# Altium PCB Pukk-Sensor-PCB.PcbDoc (part 4 of 6)
Units mil, origin at the board's own origin, x right, y up, seen from the top; angles counter-clockwise.
Board outline 3937.01 x 3149.61 mil, 4 copper layers (Top Layer, Layer 1, Layer 2, Bottom Layer), stack 61.653 mil thick; 261 components, 166 nets, 704 pads, 236 vias.
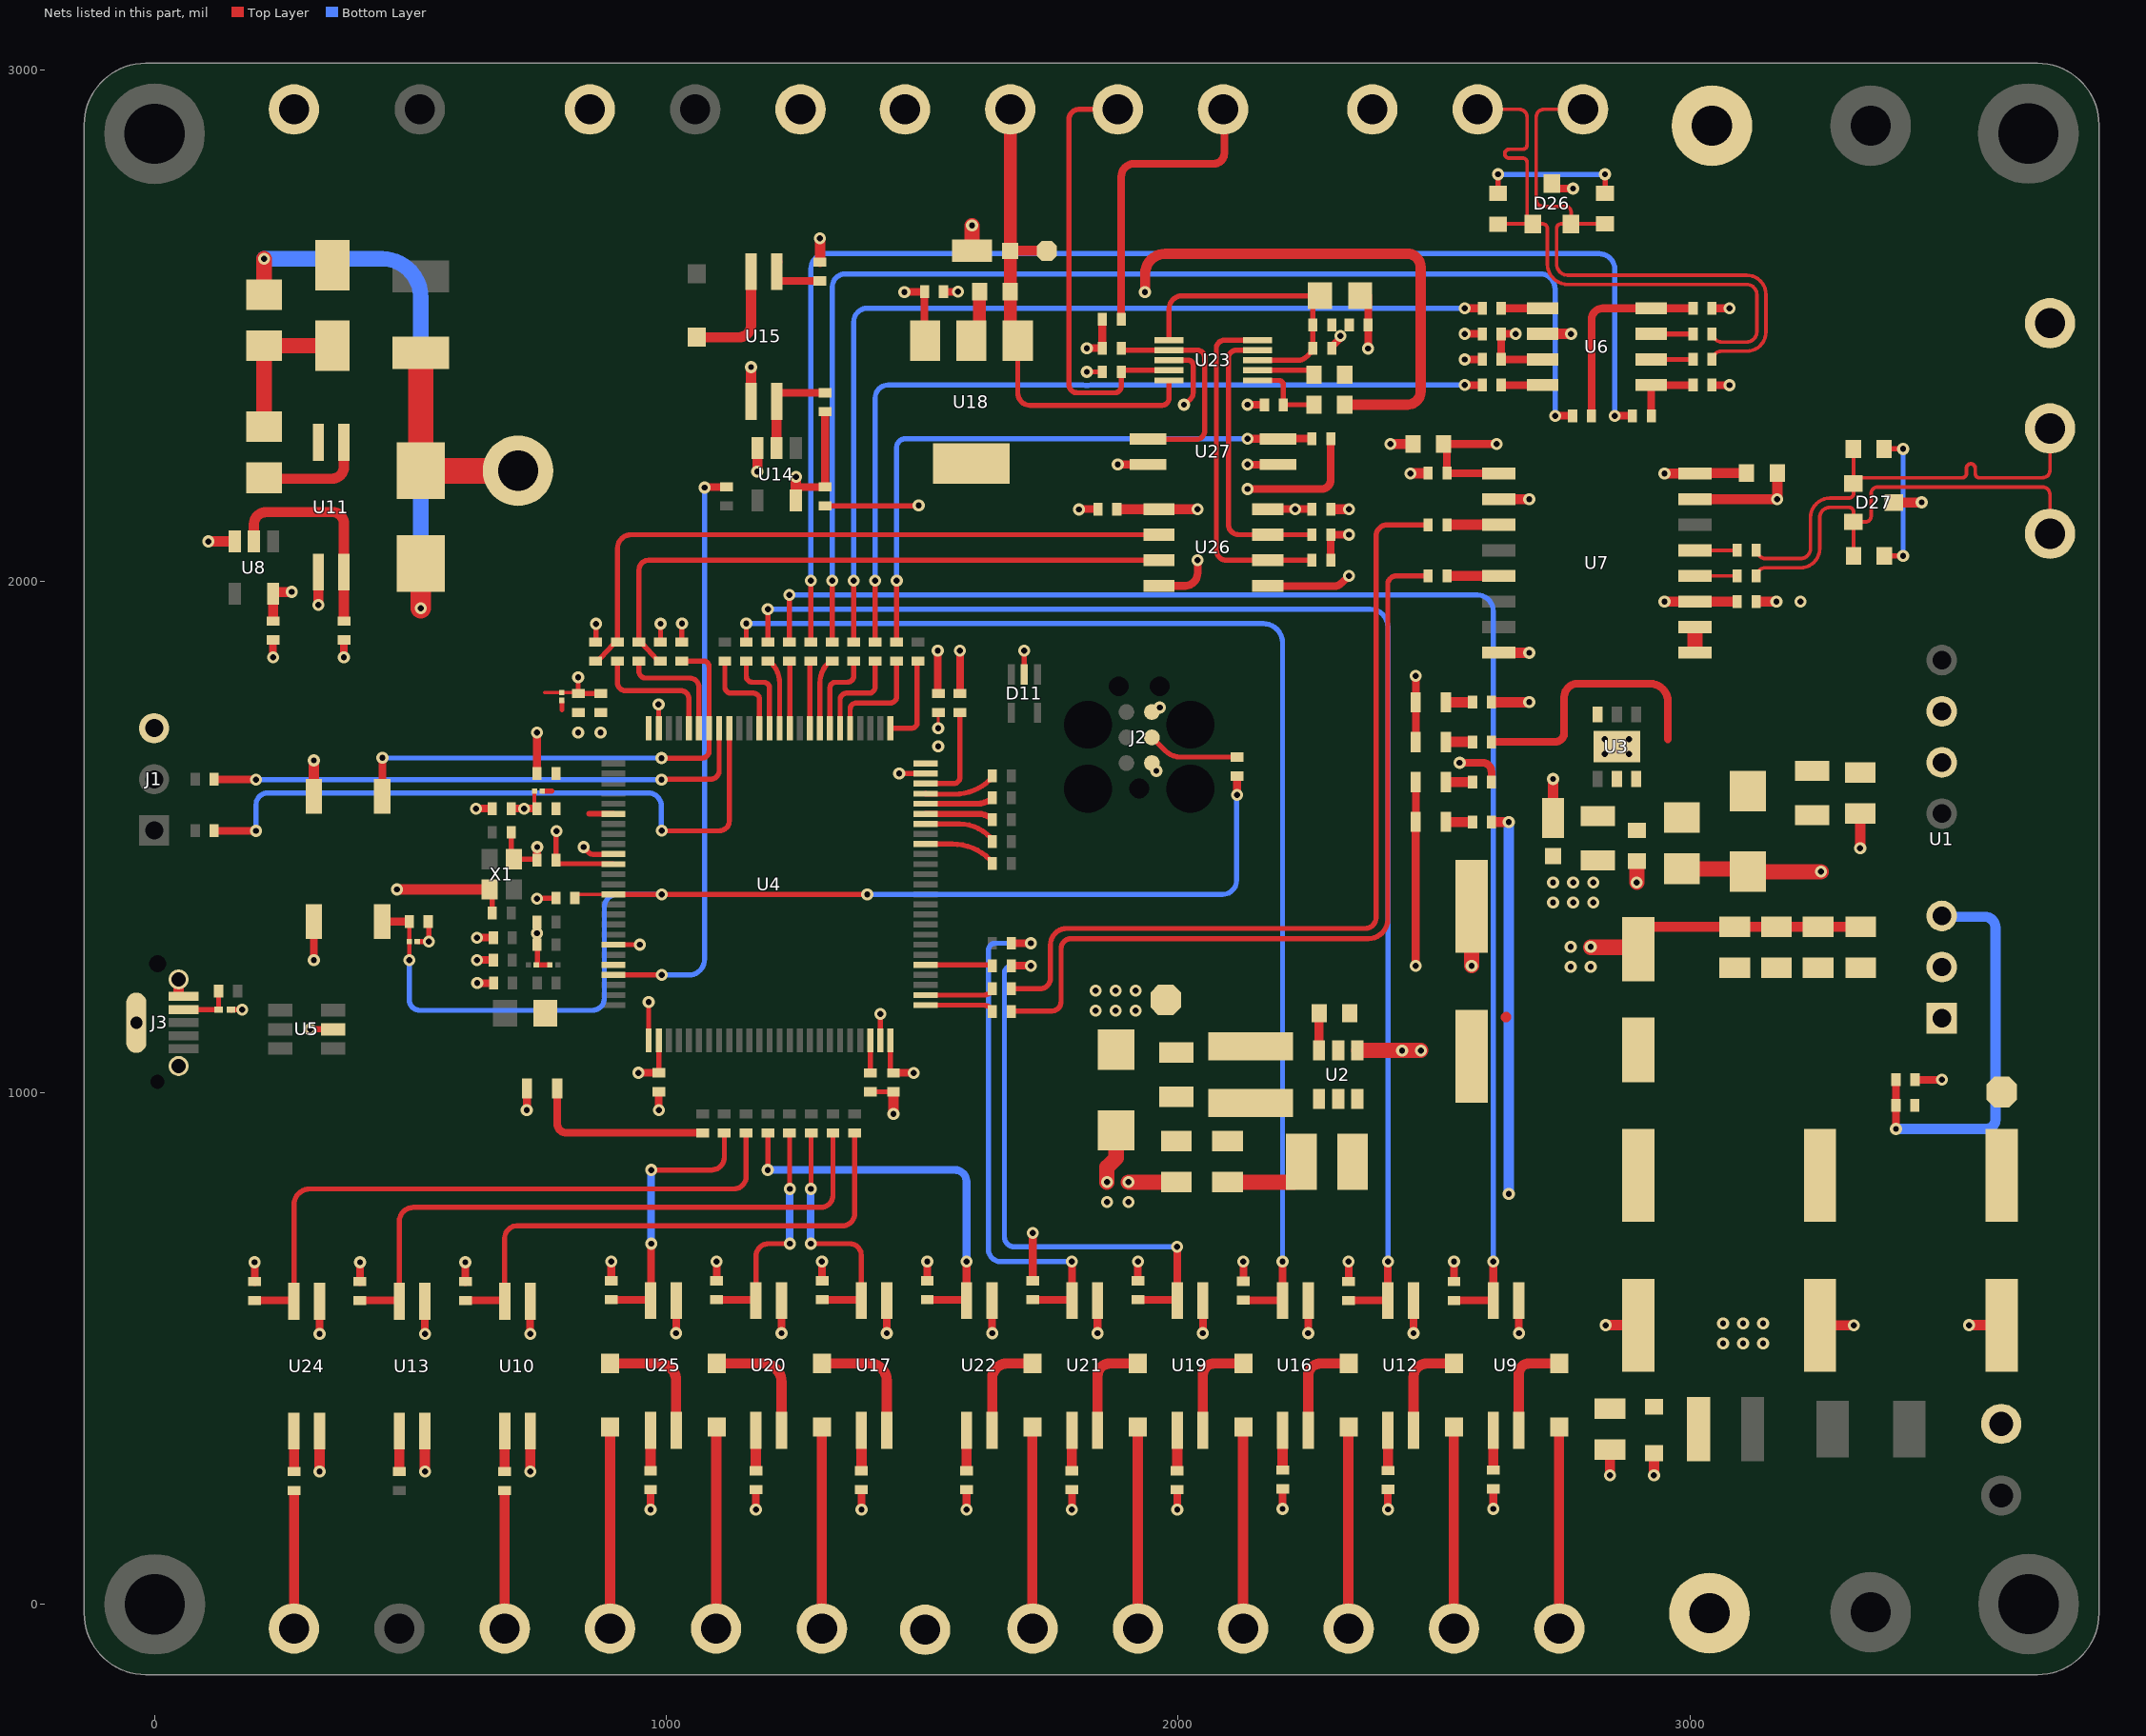
[diagram p4: the nets of this part, all layers, seen from the top]

## Part data (continued)
R66: library part RC1206FR-071KL, "RES 1K OHM 1% 1/4W 1206", Case Code (Imperial)=1206, Case Code (Metric)=3216, LCSC Part Number=C131398, Manufacturer=Yageo, Max Operating Temperature=155°C, Min Operating Temperature=-55°C, Power Rating=250mW, Resistance Tolerance=1%, Resistor Type="Thick Film", Temperature Coefficient=100ppm/°C, Voltage Rating=200V, Case/Package=1206, ComponentLink1Description=https://datasheet.ciiva.com/11808/0900766b80c6630a-11808217.pdf?src-supplier=Rs, ComponentLink1URL=https://datasheet.ciiva.com/11808/0900766b80c6630a-11808217.pdf?src-supplier=Rs, ComponentLink2Description=https://datasheet.ciiva.com/29181/402540-da-01-en-smd-widerstand-chip1206-1-kohm-29181462.pdf?src-supplier=Conrad, ComponentLink2URL=https://datasheet.ciiva.com/29181/402540-da-01-en-smd-widerstand-chip1206-1-kohm-29181462.pdf?src-supplier=Conrad, ComponentLink3Description=https://datasheet.ciiva.com/46445/444357-46445708.pdf?src-supplier=Element14, ComponentLink3URL=https://datasheet.ciiva.com/46445/444357-46445708.pdf?src-supplier=Element14, Depth=1.6mm, Height=0.55mm, Item Type=Resistors, Lead Free="Lead Free", Length=3.1mm, Manufacturer Part Number=RC1206FR-071KL, Packaging="Tape and Reel", Pricing="5000=0.003, 20000=0.0029, 75000=0.0028, 125000=0.0033, 150000=0.0027, 250000=0.0032, 375000=0.0026 (USD)", Reach SVHC Compliant=Unknown, RoHS=Yes, RoHS Compliant=Yes, Series=RC, Stock=1675000, Supplier="Future Electronics", Technology="THICK FILM", Termination=SMD/SMT, Tolerance=1%, Voltage Rating (AC)=200V
R67: library part RC1206FR-07330RL, "RES 330 OHM 1% 1/4W 1206", LCSC Part Number=C114944, Manufacturer=Yageo, Voltage Rating (AC)=200V, ComponentLink1Description=https://datasheet.ciiva.com/11819/0900766b80c6630a-11819921.pdf?src-supplier=Rs, ComponentLink1URL=https://datasheet.ciiva.com/11819/0900766b80c6630a-11819921.pdf?src-supplier=Rs, ComponentLink2Description=https://datasheet.ciiva.com/17422/pyu-rc1206-51-rohs-l-4-17422588.pdf?src-supplier=Future+Electronics, ComponentLink2URL=https://datasheet.ciiva.com/17422/pyu-rc1206-51-rohs-l-4-17422588.pdf?src-supplier=Future+Electronics, Item Type=Resistors, Lead Free=5697LeadFree, Manufacturer Part Number=RC1206FR-07330RL, Pricing="5000=0.0038, 20000=0.0037, 75000=0.0035, 125000=0.0035, 250000=0.0033 (USD)", RoHS=Yes, Stock=365000, Supplier="Future Electronics"
R79: library part RC0603FR-0775RL, "RES 75 OHM 1% 1/10W 0603", Case Code (Imperial)=0603, Case Code (Metric)=1608, LCSC Part Number=C112309, Manufacturer=Yageo, Max Operating Temperature=155°C, Max Power Dissipation=100mW, Min Operating Temperature=-55°C, Package Quantity=1, Resistance Tolerance=1%, Resistor Type="Thick Film", Supplier Part Number=311-75.0HRCT-ND, Temperature Coefficient=100ppm/°C, Voltage Rating=50V, Case/Package=0603, Category="Chip SMD Resistors", Construction=Rectangular, Depth=0.8mm, Features="Moisture Resistant", Height=0.022inch, Item Type=Resistor, Lead Free=5697LeadFree, Length=0.063inch, Manufacturer Part Number=RC0603FR-0775RL, Military Standard=Not, Number of Terminations=2, Packaging="Tape and Reel", Power Rating=100mW, Pricing="1=0.1, 10=0.019, 50=0.0112, 100=0.0093, 500=0.00622, 1000=0.00532 (USD)", Reach SVHC Compliant=No, RoHS=Yes, RoHS Compliant=Yes, Series=RC, Stock=844005, Supplier=Digikey, Technology="THICK FILM", Termination=SMD/SMT, Tolerance=1%, Voltage Rating (DC)=50V, Width=0.031inch
R87: library part RC0402FR-0749K9L, "RES 49.9K OHM 1% 1/16W 0402", Case Code (Imperial)=0402, Case Code (Metric)=1005, LCSC Part Number=C137969, Manufacturer=Yageo, Max Operating Temperature=155°C, Max Power Dissipation=63mW, Min Operating Temperature=-55°C, Power Rating=62.5mW, Supplier Part Number=311-49.9KLRCT-ND, Temperature Coefficient=100ppm/°C, Tolerance=1%, Voltage Rating=50V, Case/Package=0402, Category="Chip SMD Resistors", ComponentLink1Description=https://datasheet.ciiva.com/17071/pyu-rc0402-51-rohs-l-6-r-17071066.pdf?src-supplier=Future+Electronics, ComponentLink1URL=https://datasheet.ciiva.com/17071/pyu-rc0402-51-rohs-l-6-r-17071066.pdf?src-supplier=Future+Electronics, Construction=Rectangular, Depth=0.5mm, Features="Moisture Resistant", Item Type=Resistor, Lead Free="Lead Free", Length=1mm, Manufacturer Part Number=RC0402FR-0749K9L, Military Standard=Not, Number of Terminations=2, Packaging="Tape and Reel", Pricing="1=0.1, 10=0.015, 50=0.0088, 100=0.0073, 500=0.00488, 1000=0.00417, 5000=0.00297 (USD)", RoHS=Yes, RoHS Compliant=Yes, Series=RC, Stock=5084418, Supplier=Digikey, Termination=SMD/SMT, Voltage Rating (DC)=50V
R91 R93: library part RT0603BRD0710KL, "RES SMD 10K OHM 0.1% 1/10W 0603", Case/Package=0603, LCSC Part Number=C95204, Manufacturer=Yageo, Max Operating Temperature=155°C, Min Operating Temperature=-55°C, Package Height=0.45mm, Package Length=1.6mm, Package Style=SMTMeter, Package Width=0.8mm, Power=100mW, Rated Temperature=70°C, Resistor Type="FIXED RESISTOR", Supplier Part Number 1=1991391P, Temperature Coefficient=25ppm/°C, Tolerance=0.1%, Working Voltage=75V, Category="Chip SMD Resistors", ComponentLink1Description=https://datasheet.ciiva.com:443/pdfs/VipMasterIC/IC/YAGO/YAGO-S-A0008510989/YAGO-S-A0008510989-1.pdf?src-supplier=IHS+Markit, ComponentLink1URL=https://datasheet.ciiva.com:443/pdfs/VipMasterIC/IC/YAGO/YAGO-S-A0008510989/YAGO-S-A0008510989-1.pdf?src-supplier=IHS+Markit, ComponentLink2Description=https://datasheet.ciiva.com/5624/pyu-rt-1-to-0-05-rohs-l-4-5624351.pdf?src-supplier=Mouser, ComponentLink2URL=https://datasheet.ciiva.com/5624/pyu-rt-1-to-0-05-rohs-l-4-5624351.pdf?src-supplier=Mouser, ComponentLink3Description=https://datasheet.ciiva.com/29721/pyu-rt-1-to-0-05-rohs-l-4-29721177.pdf?src-supplier=Digi-Key, ComponentLink3URL=https://datasheet.ciiva.com/29721/pyu-rt-1-to-0-05-rohs-l-4-29721177.pdf?src-supplier=Digi-Key, Construction=Chip, Item Type=Resistor, Manufacturer Part Number=RT0603BRD0710KL, Mounting Technology="Surface Mount", Packaging="Tape and Reel", Pins=2, Pricing 1="100=0.29800, 250=0.27800, 500=0.25900, 1000=0.23700 (GBP)", Reach SVHC Compliant=Yes, RoHS=Yes, RoHS Compliant=Yes, Stock 1=20510, Supplier 1=Rs, Technology="THIN FILM", Termination=Wraparound
R102 R103: library part RC0603JR-070RL, "RES 0 OHM JUMPER 1/10W 0603", Case Code (Imperial)=0603, Case Code (Metric)=1608, LCSC Part Number=C95177, Manufacturer=Yageo, Max Operating Temperature=155°C, Max Power Dissipation=100mW, Min Operating Temperature=-55°C, Package Quantity=5000, Resistance=0mR, Resistance Tolerance=5%, Resistor Type="Thick Film", Supplier Part Number 1=311-0.0GRCT-ND, Temperature Coefficient=200ppm/°C, Tolerance=1%, Voltage Rating=50V, Case/Package=0603, Category="Chip SMD Resistors", Construction=Rectangular, Contact Plating=Tin,Matte, Depth=0.8mm, Features="Moisture Resistant", Height=0.45mm, Item Type=Resistor, Lead Free="Lead Free", Length=1.6mm, Manufacturer Part Number=RC0603JR-070RL, Military Standard=Not, Number of Pins=2, Number of Terminations=2, Packaging="Tape and Reel", Power Rating=100mW, Pricing 1="1=0.10000, 10=0.01700, 25=0.01240, 50=0.00960, 100=0.00700, 250=0.00536, 500=0.00430, 1000=0.00316 (USD)", Radiation Hardening=No, Reach SVHC Compliant="No SVHC", RoHS=Yes, RoHS Compliant=Yes, Series=RC, Size Code=0603, Stock 1=18081776, Supplier 1=Digi-Key, Technology="THICK FILM", Termination=SMD/SMT, Voltage Rating (DC)=50V, Width=0.8mm
SW1 SW2: "SWITCH TACTILE SPST-NO 0.05A 12V", Contact Current Rating=50mA, Contact Resistance=100mR, Insulation Resistance=100MR, LCSC Part Number=C231329, Manufacturer=Omron, Max Operating Temperature=70°C, Max Voltage Rating (DC)=12V, Min Operating Temperature=-25°C, Operating Force=1.5N, Package Quantity=1, Ratings="Dust Proof,IP40", Supplier Part Number 1=SW1020DKR-ND, Actuator Length=0.4mm, Actuator Type=Standard, ComponentLink1Description=http://www.farnell.com/datasheets/60838.pdf?src-supplier=Farnell, ComponentLink1URL=http://www.farnell.com/datasheets/60838.pdf?src-supplier=Farnell, ComponentLink2Description=http://www.farnell.com/datasheets/60838.pdf?src-supplier=Element14, ComponentLink2URL=http://www.farnell.com/datasheets/60838.pdf?src-supplier=Element14, ComponentLink3Description=https://omronfs.omron.com/en_US/ecb/products/pdf/en-b3u.pdf?src-supplier=Digi-Key, ComponentLink3URL=https://omronfs.omron.com/en_US/ecb/products/pdf/en-b3u.pdf?src-supplier=Digi-Key, ComponentLink4Description=http://www.omron.com/ecb/products/pdf/en-b3u.pdf?src-supplier=Digi-Key, ComponentLink4URL=http://www.omron.com/ecb/products/pdf/en-b3u.pdf?src-supplier=Digi-Key, ComponentLink5Description=https://www.distrelec.biz/Web/Downloads/he/et/B3U_eng_datasheet.pdf?mime=application%2Fpdf&src-supplier=Distrelec, ComponentLink5URL=https://www.distrelec.biz/Web/Downloads/he/et/B3U_eng_datasheet.pdf?mime=application%2Fpdf&src-supplier=Distrelec, ComponentLink6Description=http://www.onlinecomponents.com/productFiles/mf-OM/en-b3u.pdf?src-supplier=Onlinecomponents.com, ComponentLink6URL=http://www.onlinecomponents.com/productFiles/mf-OM/en-b3u.pdf?src-supplier=Onlinecomponents.com, ComponentLink7Description=https://www.verical.com/server-webapp/html/getDatasheet?partID=552554&src-supplier=Verical, ComponentLink7URL=https://www.verical.com/server-webapp/html/getDatasheet?partID=552554&src-supplier=Verical, ComponentLink8Description=http://www.farnell.com/datasheets/1685550.pdf?src-supplier=Element14, ComponentLink8URL=http://www.farnell.com/datasheets/1685550.pdf?src-supplier=Element14, ComponentLink9Description=http://www.farnell.com/datasheets/2610940.pdf?src-supplier=Farnell, ComponentLink9URL=http://www.farnell.com/datasheets/2610940.pdf?src-supplier=Farnell, ComponentLink10Description=https://www.alliedelec.com/m/d/4c8a9ef82804fc3c241a13c1e298fd73.pdf?src-supplier=Allied+Electronics, ComponentLink10URL=https://www.alliedelec.com/m/d/4c8a9ef82804fc3c241a13c1e298fd73.pdf?src-supplier=Allied+Electronics, Contact Material=Silver, Current Rating=50mA, Depth=2.5mm, Electrical Life=200000Cycles, Height=1.2mm, Illumination Type=Non-Illuminated,Illuminated, Item Type=Switch, Lead Free="Lead Free", Length=4mm, Manufacturer Part Number=B3U-1000P, Max Current Rating=50mA, Mechanical Life=200000Cycles, Mount="Surface Mount", Orientation=Straight, Packaging="Tape and Reel", Pricing 1="1=1, 10=0.961, 25=0.9064, 50=0.7976, 100=0.7251, 250=0.68888, 500=0.67074, 1000=0.52571 (USD)", REACH SVHC=Unknown, Stock 1=116454, Supplier 1=Digi-Key, Switch Function=Off-Mom, Switch Travel=0.15mm, Termination=SMD/SMT, Throw Configuration=SPST, Voltage Rating (DC)=12V, Weight=0.000776oz, Width=3mm
U1: "SIP Isolated Power Modules ROHS", LCSC Part Number=C5369846, Manufacturer=YLPTEC, Package=SIP, ComponentLink1Description=LCSC, ComponentLink1URL=https://www.lcsc.com/product-detail/Isolated-Power-Modules_YLPTEC-VRB1205S-6WR3_C5369846.html, Item Type="Power Module", Manufacturer Part Number=VRB1205S-6WR3
U2: "IC REG BUCK 5V 2A TSOT26", LCSC Part Number=C2071056, Manufacturer=Diodes, Supplier Part Number 1=AP63205WU-7DICT-ND, Category="Voltage Regulators - Switching", Item Type=IC, Manufacturer Part Number=AP63205WU-7, Pricing 1="1=0.88, 10=0.776, 25=0.7292, 100=0.5952, 250=0.55284, 500=0.4705, 1000=0.3764 (USD)", RoHS=Yes, Stock 1=88525, Supplier 1=Digi-Key
U3: "IC REG LINEAR 3.3V 1.3A 6DFN", LCSC Part Number=C283488, Manufacturer=STMicroelectronics, ComponentLink1Description=https://datasheet.ciiva.com/2053/cd00186925-2053848.pdf?src-supplier=Digikey, ComponentLink1URL=https://datasheet.ciiva.com/2053/cd00186925-2053848.pdf?src-supplier=Digikey, ComponentLink2Description=https://datasheet.ciiva.com/2053/cd00186925-2053849.pdf?src-supplier=Digikey, ComponentLink2URL=https://datasheet.ciiva.com/2053/cd00186925-2053849.pdf?src-supplier=Digikey, ComponentLink3Description=https://datasheet.ciiva.com/2053/cd00186925-2053850.pdf?src-supplier=Digikey, ComponentLink3URL=https://datasheet.ciiva.com/2053/cd00186925-2053850.pdf?src-supplier=Digikey, ComponentLink4Description=https://datasheet.ciiva.com/16489/cd00186925-16489850.pdf?src-supplier=Future+Electronics, ComponentLink4URL=https://datasheet.ciiva.com/16489/cd00186925-16489850.pdf?src-supplier=Future+Electronics, Item Type=IC, Manufacturer Part Number=ST1L05APU33R, Pricing="1=1.06, 10=0.766, 25=0.692, 100=0.6103, 250=0.57136, 500=0.5479, 1000=0.5286 (USD)", RoHS=Yes, Stock=7599, Supplier=Digikey
U4: "IC MCU 32BIT 1MB FLASH 100LQFP", Frequency=550MHz, LCSC Part Number=C730142, Manufacturer=STMicroelectronics, Max Operating Temperature=85°C, Max Supply Voltage=3.6V, Min Operating Temperature=-40°C, Nominal Supply Current=4uA, Density=1MB, Item Type=Microcontrollers, Manufacturer Part Number=STM32H723VGT6, Number of A/D Converters=1, Number of Channels=14, Number of I2C Channels=5, Number of I/Os=80, Number of SPI Channels=5, Number of Timers/Counters=4, Number of UART Channels=6, Pricing="1=9.579, 10=8.258, 25=7.389, 100=7.316, 250=6.922, 540=6.641, 1080=6.564 (USD)", RAM Size=564KB, RoHS=No, Stock=102408, Supplier="Arrow Electronics"
U5: "6A 12V 150W 6V Unidirectional 5V SOT-23-6 ESD and Surge Protection (TVS/ESD) ROHS", LCSC Part Number=C2827654, Manufacturer="TECH PUBLIC", Package=SOT-23-6, ComponentLink1Description=LCSC, ComponentLink1URL=https://www.lcsc.com/product-detail/ESD-and-Surge-Protection-TVS-ESD_TECH-PUBLIC-USBLC6-2SC6_C2827654.html, Item Type=(TVS/ESD), Manufacturer Part Number=USBLC6-2SC6
U6: "IC TRANSCEIVER HALF 1/1 8SOIC", Case/Package=SOIC, LCSC Part Number=C22396693, Manufacturer="Texas Instruments", Height=1.75mm, Item Type=IC, Length=4.9mm, Manufacturer Part Number=TCAN3414DR, Pins=8, Pricing="1=1.55, 10=1.1, 50=1.1, 100=0.895, 1000=0.763, 10000=0.681 (USD)", RoHS=No, Stock=201, Supplier=Mouser, Thickness=1.58mm, Width=3.91mm
U7: "IC TRANSCEIVER FULL 1/1 16SOIC", LCSC Part Number=C1848126, Manufacturer="Texas Instruments", ComponentLink1Description=http://www.ti.com/lit/gpn/iso1042?src-supplier=Digikey, ComponentLink1URL=http://www.ti.com/lit/gpn/iso1042?src-supplier=Digikey, Item Type=IC, Manufacturer Part Number=ISO1042DWR, Pricing="1=3.75, 10=2.83, 50=2.6, 100=2.35, 1000=2.09, 10000=1.92 (USD)", RoHS=Yes, Stock=2008, Supplier=Mouser
U8 U14: "IC INVERTER 1CH 1-INP SOT23-5", Case/Package=SOT-23, High Level Output Current=-8mA, LCSC Part Number=C7469, Low Level Output Current=8mA, Manufacturer="Texas Instruments", Max Operating Temperature=125°C, Max Supply Voltage=5.5V, Min Operating Temperature=-40°C, Min Supply Voltage=2V, Quiescent Current=1uA, ComponentLink1Description=https://datasheet.ciiva.com/4219/814sn74ahc1g14-4219764.pdf?src-supplier=Arrow+Electronics, ComponentLink1URL=https://datasheet.ciiva.com/4219/814sn74ahc1g14-4219764.pdf?src-supplier=Arrow+Electronics, ComponentLink2Description=https://datasheet.ciiva.com/15089/getdatasheetpartid-190002-15089353.pdf?src-supplier=Verical, ComponentLink2URL=https://datasheet.ciiva.com/15089/getdatasheetpartid-190002-15089353.pdf?src-supplier=Verical, ComponentLink3Description=https://datasheet.ciiva.com/7783/sn74ahc1g14-7783206.pdf?src-supplier=Element14, ComponentLink3URL=https://datasheet.ciiva.com/7783/sn74ahc1g14-7783206.pdf?src-supplier=Element14, ComponentLink4Description=https://datasheet.ciiva.com/7783/sn74ahc1g14-7783205.pdf?src-supplier=Element14, ComponentLink4URL=https://datasheet.ciiva.com/7783/sn74ahc1g14-7783205.pdf?src-supplier=Element14, ComponentLink5Description=https://datasheet.ciiva.com/46384/1882896-46384391.pdf?src-supplier=Element14, ComponentLink5URL=https://datasheet.ciiva.com/46384/1882896-46384391.pdf?src-supplier=Element14, ComponentLink6Description=https://datasheet.ciiva.com/1864/sn74ahc1g14-1864204.pdf?src-supplier=Digikey, ComponentLink6URL=https://datasheet.ciiva.com/1864/sn74ahc1g14-1864204.pdf?src-supplier=Digikey, ComponentLink7Description=https://datasheet.ciiva.com/1864/sn74ahc1g14-1864203.pdf?src-supplier=Digikey, ComponentLink7URL=https://datasheet.ciiva.com/1864/sn74ahc1g14-1864203.pdf?src-supplier=Digikey, ComponentLink8Description=https://datasheet.ciiva.com/1864/sn74ahc1g14-1864205.pdf?src-supplier=Digikey, ComponentLink8URL=https://datasheet.ciiva.com/1864/sn74ahc1g14-1864205.pdf?src-supplier=Digikey, ComponentLink9Description=https://datasheet.ciiva.com/48703/001074495-da-01-en-ic-schmitt-sn74ahc1g14dbvr-sot-23-5-tid-48703787.pdf?src-supplier=Conrad, ComponentLink9URL=https://datasheet.ciiva.com/48703/001074495-da-01-en-ic-schmitt-sn74ahc1g14dbvr-sot-23-5-tid-48703787.pdf?src-supplier=Conrad, Input Type="SCHMITT TRIGGER", Item Type=IC, Lead Free="Lead Free", Logic Function="Inverter,Schmitt Trigger", Manufacturer Part Number=SN74AHC1G14DBVR, Max Output current=8mA, Mounting Technology="Surface Mount", Number of Bits=1, Number of Circuits=1, Number of Elements=1, Number of Gates=1, Number of Inputs=1, Output Current=8mA, Packaging="Tape and Reel", Pins=5, Pricing="1=0.1, 10=0.062, 50=0.054, 100=0.046, 1000=0.037, 10000=0.031 (USD)", Propagation Delay=10.6ns, Radiation Hardening=No, Reach SVHC Compliant=No, RoHS=Yes, RoHS Compliant=Yes, Series=74AHC, Stock=69702, Supplier=Mouser, Technology=CMOS, Termination=SMD/SMT, Turn-On Delay Time=18.5ns, Weight=0.000557oz
U9 U10 U11 U12 U13 U15 U16 U17 U19 U20 U21 U22 U24 U25 U27: "OPTOISO 3.75KV 1CH TRANS 4-SSOP", LCSC Part Number=C4749236, Manufacturer="Vishay Semiconductors", ComponentLink1Description=https://datasheet.ciiva.com/14809/vos617a-14809107.pdf?src-supplier=Arrow+Electronics, ComponentLink1URL=https://datasheet.ciiva.com/14809/vos617a-14809107.pdf?src-supplier=Arrow+Electronics, ComponentLink2Description=https://datasheet.ciiva.com/30032/vos617a-30032543.pdf?src-supplier=Avnet, ComponentLink2URL=https://datasheet.ciiva.com/30032/vos617a-30032543.pdf?src-supplier=Avnet, ComponentLink3Description=https://datasheet.ciiva.com/18615/vos617a-18615995.pdf?src-supplier=Digikey, ComponentLink3URL=https://datasheet.ciiva.com/18615/vos617a-18615995.pdf?src-supplier=Digikey, Item Type=Optocouplers, Manufacturer Part Number=VOS617A-4T, Pricing="3000=0.1642, 6000=0.1638, 9000=0.1528, 15000=0.1513, 21000=0.1495, 30000=0.1428 (USD)", RoHS=Yes, Stock=6000, Supplier="Arrow Electronics"
U18: "IC REG LIN POS ADJ 500MA SOT223", Case/Package=SOT-223-4, LCSC Part Number=C840113, Manufacturer="Texas Instruments", Max Operating Temperature=125°C, Max Output current=500mA, Max Output Voltage=37V, Max Supply Voltage=40V, Min Input Voltage=4.2V, Min Operating Temperature=-40°C, Min Output Voltage=1.25V, Package Quantity=1, Power Supply Rejection Ratio (PSRR)=80dB, Quiescent Current=3.5mA, Reference Voltage=1.3V, Supplier Part Number=595-LM317MDCYR, Category="Voltage Regulators - Linear", ComponentLink1Description=https://datasheet.ciiva.com/1643/755612-1643356.pdf?src-supplier=Newark, ComponentLink1URL=https://datasheet.ciiva.com/1643/755612-1643356.pdf?src-supplier=Newark, ComponentLink2Description=https://datasheet.ciiva.com/41458/001014040-da-01-en-ic-reg-adj-0-5-lm317mdcyr-sot-223-4-tid-41458215.pdf?src-supplier=Conrad, ComponentLink2URL=https://datasheet.ciiva.com/41458/001014040-da-01-en-ic-reg-adj-0-5-lm317mdcyr-sot-223-4-tid-41458215.pdf?src-supplier=Conrad, ComponentLink3Description=https://datasheet.ciiva.com/1512/1814942-1512040.pdf?src-supplier=Element14, ComponentLink3URL=https://datasheet.ciiva.com/1512/1814942-1512040.pdf?src-supplier=Element14, ComponentLink4Description=https://datasheet.ciiva.com/46398/755612-46398903.pdf?src-supplier=Element14, ComponentLink4URL=https://datasheet.ciiva.com/46398/755612-46398903.pdf?src-supplier=Element14, ComponentLink5Description=https://datasheet.ciiva.com/46419/1814942-46419370.pdf?src-supplier=Element14, ComponentLink5URL=https://datasheet.ciiva.com/46419/1814942-46419370.pdf?src-supplier=Element14, ComponentLink6Description=https://datasheet.ciiva.com/2042/lm317m-2042100.pdf?src-supplier=Digikey, ComponentLink6URL=https://datasheet.ciiva.com/2042/lm317m-2042100.pdf?src-supplier=Digikey, ComponentLink7Description=https://datasheet.ciiva.com/2042/lm317m-2042099.pdf?src-supplier=Digikey, ComponentLink7URL=https://datasheet.ciiva.com/2042/lm317m-2042099.pdf?src-supplier=Digikey, ComponentLink8Description=https://datasheet.ciiva.com/2042/lm317m-2042101.pdf?src-supplier=Digikey, ComponentLink8URL=https://datasheet.ciiva.com/2042/lm317m-2042101.pdf?src-supplier=Digikey, ComponentLink9Description=https://datasheet.ciiva.com/14280/lm317mq-14280776.pdf?src-supplier=Avnet, ComponentLink9URL=https://datasheet.ciiva.com/14280/lm317mq-14280776.pdf?src-supplier=Avnet, Item Type=IC, Lead Free="Lead Free", Manufacturer Part Number=LM317MDCYR, Mounting Technology="Surface Mount", Number of Outputs=1, Number of Regulators=1, Output Current=500mA, Output Type=Adjustable, Output Voltage=37V, Packaging="Tape and Reel", Pins=4, Polarity=Positive, Pricing="1=0.67, 10=0.564, 50=0.564, 100=0.428, 500=0.359, 1000=0.283, 2500=0.263, 5000=0.245, 10000=0.236, 25000=0.227 (USD)", Radiation Hardening=No, Reach SVHC Compliant=No, RoHS=Yes, RoHS Compliant=Yes, Series=-, Stock=12890, Supplier=Mouser, Weight=0.006632oz
U23: "IC ADC 16BIT SIGMA-DELTA 10VSSOP", Case/Package=VSSOP, LCSC Part Number=C37593, Manufacturer="Texas Instruments", Max Operating Temperature=125°C, Max Supply Voltage=5.5V, Min Operating Temperature=-40°C, Min Supply Voltage=2V, Nominal Supply Current=150uA, Package Quantity=2500, Power Dissipation=900uW, Supplier Part Number=595-ADS1115IDGSR, Category="Analog to Digital Converters (ADCs)", ComponentLink1Description=https://datasheet.ciiva.com/4031/47725463s8438921n7713-4031028.pdf?src-supplier=Arrow+Electronics, ComponentLink1URL=https://datasheet.ciiva.com/4031/47725463s8438921n7713-4031028.pdf?src-supplier=Arrow+Electronics, Contact Plating=Gold, Conversion Rate=0.86KS/s, Height=1.07mm, Integral Nonlinearity (INL)=1LSB, Interface=I2C, Item Type=IC, Lead Free="Lead Free", Length=3mm, Manufacturer Part Number=ADS1115IDGSR, Max Supply Voltage (DC)=5.5V, Min Supply Voltage (DC)=2V, Number of A/D Converters=1, Number of Bits=16, Number of Channels=2, Number of Converters=1, Number of Inputs=4, Packaging="Tape and Reel", Pins=10, Polarity=Bipolar, Pricing="1=5.44, 10=4.76, 50=4.76, 100=4.01, 1000=2.88, 10000=2.78 (USD)", Reach SVHC Compliant=No, Resolution=16b, RoHS=Yes, RoHS Compliant=Yes, Sampling Rate=860S/s, Series=-, Stock=5925, Supplier=Mouser, Supply Type=Single, Thickness=1.02mm, Width=3mm
U26: "DGTL ISOLTR 2.5KV 2CH I2C 8-SOIC", Case/Package=SOIC, Isolated Power=No, LCSC Part Number=C179739, Manufacturer="Texas Instruments", Max Operating Temperature=125°C, Max Supply Voltage=5.5V, Min Operating Temperature=-40°C, Min Supply Voltage=3V, Package Quantity=1, Supply Current=3.6mA, Working Voltage=566V, Channel Type=Bidirectional, ComponentLink1Description=https://datasheet.ciiva.com/6579/iso1540-6579724.pdf?src-supplier=Digikey, ComponentLink1URL=https://datasheet.ciiva.com/6579/iso1540-6579724.pdf?src-supplier=Digikey, ComponentLink2Description=https://datasheet.ciiva.com/6579/iso1540-6579723.pdf?src-supplier=Digikey, ComponentLink2URL=https://datasheet.ciiva.com/6579/iso1540-6579723.pdf?src-supplier=Digikey, ComponentLink3Description=https://datasheet.ciiva.com/6579/iso1540-6579725.pdf?src-supplier=Digikey, ComponentLink3URL=https://datasheet.ciiva.com/6579/iso1540-6579725.pdf?src-supplier=Digikey, ComponentLink4Description=https://datasheet.ciiva.com/14196/iso1540-14196749.pdf?src-supplier=Avnet, ComponentLink4URL=https://datasheet.ciiva.com/14196/iso1540-14196749.pdf?src-supplier=Avnet, Data Rate=1Mbps, Height=1.75mm, Interface=39,4268Interface, Item Type=IC, Lead Free="Lead Free", Length=4.9mm, Manufacturer Part Number=ISO1540DR, Number of Channels=2, Packaging="Tape and Reel", Pins=8, Pricing="1=4.01, 10=2.79, 50=2.79, 100=2.52, 1000=2.25, 10000=2.16 (USD)", Propagation Delay=70ns, Pulse Width Distortion (PWD)=21ns, Reach SVHC Compliant=No, RoHS=Yes, RoHS Compliant=Yes, Series=-, Stock=9421, Supplier=Mouser, Thickness=1.58mm, Width=3.91mm
X1: library part Q22FA12800150, "CRYSTAL 48.0000MHZ 10PF SMD", LCSC Part Number=2471841RL, Manufacturer=Epson, Item Type=Crystal, Manufacturer Part Number=Q22FA12800150, Pricing="500=0.24 (GBP)", Supplier=Farnell

## Free pads (board coordinates)
  round 196.85 hole 118.11: MH(-0.36,2874.38) MH(0,0) MH(3661.42,2874.74) MH(3661.78,0.36)

## Via types
v1: diameter 23.62, hole 11.81, Top Layer to Bottom Layer, tented both sides, 234 vias
v2: diameter 23.62, hole 11.81, Top Layer to Bottom Layer, 2 vias

## Nets (pads, with @x,y where several pads share a name; then routed paths per layer and width w, separated by ;. In a path a pad name is that pad's centre, name@x,y a point inside that pad or via, vN(x,y) a via of type N, cw(c..) or ccw(c..) an arc to the next point about the centre after c; other vN are vias at no path point)
3V3-ISO: C15.2 C16.2 C17.2 C18.2 C19.2 C20.2 C29.2 C30.2 C31.2 C32.2 C35.1 C36.1 C41.1 D5.2 D6.2 F4.2 J2.1 R5.1 R7.1 R8.2 R11.2 R47.2 R61.2 R62.2 R63.2 R68.2 R69.2 R72.2 R74.2 R75.2 R78.2 R80.2 R83.2 R85.2 R89.2 R95.2 R97.2 R99.2 R101.1 SW2.2 U4.11 U4.27 U4.50 U4.75 U4.100 U6.3 U7.1 U8.5 U14.5 U26.1 | length 2577
  Top Layer w6: v1(1531.16,1712.49) C19.2@1531.16,1743.23 ; v1(2038,2140.58) v1@2038,2140.72
  Top Layer w10: v1(746.82,1379.13) 747.55,1379.85 783.19,1379.85 R11.2@783.92,1380.58 ; v1(784.79,1511.22) 784.35,1510.78 784.35,1452.08 783.92,1451.65 787.92,1447.65 895.4,1447.65 U4.11@896.3,1446.74 ; 795.74,1748.66 D6.2@795.74,1764.02 ; R97.2@862,1880.88 v1@862,1916.5 ; C17.2@984.88,1038.87 U4.27@984.88,1102.25 ; R99.2@988.4,1881.11 v1(988.42,1916.76) ; U4.50@1437.64,1102.25 1437.64,1044.62 ccw(c1443.55,1044.62) C18.2@1443.55,1038.72 ; J2.1@1948.67,1644.31 1948.67,1638.3 ccw(c1958.15,1638.3) 1958.15,1628.82 v1(1957.35,1629.03)
  Top Layer w15: R89.2@195.21,629.4 R89.2@195.21,630.9 v1(195.21,668.5) ; v1(369.64,1851) R62.2@369.64,1884.92 ; R69.2@401.08,629.4 R69.2@401.08,630.9 v1(401.08,668.5) ; R63.2@606.94,629.4 R63.2@606.94,630.9 v1(606.94,668.5) ; v1(629.65,1303.04) R8.2@661.7,1303.04 ; R7.1@746.92,1624.27 v1(746.92,1703.87) ; R95.2@892.04,630.9 R95.2@892.04,632.4 v1(892.04,670) ; v1(945,1038.87) C17.2@984.88,1038.87 ; R80.2@1097.9,630.9 R80.2@1097.9,632.4 v1(1097.9,670) ; 1252.86,2183.98 C36.1@1310,2183.98 R72.2@1310,2331.22 ; R75.2@1303.76,630.9 v1(1303.76,670) ; C18.2@1443.55,1038.72 v1(1482.92,1038.72) ; R85.2@1509.62,630.9 R85.2@1509.62,632.4 v1(1509.62,670) ; R83.2@1715.74,632.15 1715.74,725.74 v1(1716,726) ; R78.2@1921.35,630.9 R78.2@1921.35,632.4 v1(1921.35,670) ; R74.2@2127.21,630.9 R74.2@2127.21,631.4 v1(2127.21,670) ; v1(2135.31,2180) 2279.81,2180 ccw(c2279.81,2198.5) 2298.31,2198.5 R101.1@2298.31,2278.42 ; R68.2@2333.07,630.9 v1(2333.07,670) ; R61.2@2538.93,630.9 v1(2538.93,670) ; v1(2622.22,2268.04) C31.2@2518.72,2268.04 cw(c2518.72,2261.54) 2525.22,2261.54 C32.2@2525.22,2211.09 2625.29,2211.09 cw(c2625.29,2210.09) U7.1@2626.29,2210.09 ; v1(2659.6,2483.32) C29.2@2631.22,2483.32 C30.2@2631.22,2433.32 U6.3@2711.92,2433.32 ; R47.2@3043.22,2533.32 v1(3077.45,2533.32)
  Top Layer w20: C35.1@231.1,1926.32 231.1,1976.54 232.92,1978.36 266.71,1978.36 v1(267.41,1979.05) ; SW2.2@310.77,1579.57 v1(310.77,1649.5) ; U14.5@1252.86,2157.86 1252.86,2183.98 v1@1252.86,2203.68 ; C41.1@1883.38,2140.72 U26.1@1962.4,2140.72 v1@2038,2140.72 ; R5.1@2614.41,1763.32 v1(2686,1763.32)
  other v1: 2732.71,1372 2771.82,1372 2810.94,1372 2732.71,1411 2771.82,1411 2810.94,1411 1531.16,1676.75 827.3,1703.87 871.12,1703.87 862.02,1916.53 1253.08,2203.9
5V: C33.2 C34.2 C40.2 C42.2 D4.2 F3.2 FB2.2 R6.1 R84.1 R92.2 R98.2 R100.2 TP2.1 U7.11 U7.16 U26.8 | length 768.8
  Top Layer w10: FB2.2@2355.69,2557.66 FB2.2@2371.19,2557.66 ; U7.16@3010.15,2210.09 cw(c3011.15,2210.09) U7.16@3011.15,2211.09
  Top Layer w15: v1(1821.26,2455.27) R92.2@1851.7,2455.27 R84.1@1851.68,2511.81 ; U26.8@2175,2140.72 C42.2@2261.31,2140.72 ; R100.2@2298.31,2040.72 R98.2@2298.31,2090.72 v1(2333.91,2090.72) ; v1(2371.19,2454.69) FB2.2@2371.19,2557.66 ; v1(2550,1645) 2594.5,1645 cw(c2594.5,1627.3) 2612.2,1627.3 R6.1@2612.2,1607.27
  Top Layer w20: v1@2950.45,1960.09 U7.11@3010.15,1960.09 C33.2@3088.69,1960.09 ; v1@2950.45,2210.09 U7.16@3010.15,2210.09 ; U7.16@3011.15,2211.09 C34.2@3110.72,2211.09
  other v1: 1838.54,1160.59 1877.65,1160.59 1916.77,1160.59 1838.54,1199.59 1877.65,1199.59 1916.77,1199.59 2950.45,1960.17 2228.59,2140.58 2950.45,2210.17
5V-ISO: C11.2 D2.2 F1.2 R4.1 U3.3 | length 533.3
  Top Layer w15: R4.1@2612.19,1685.78 2736.5,1685.78 ccw(c2736.5,1703.64) 2754.36,1703.64 2754.36,1773.41 cw(c2780.43,1773.41) 2780.43,1799.48 2922.36,1799.48 cw(c2922.36,1764.84) 2957,1764.84 2957,1691
12V: C2.1 C3.1 C4.2 C5.2 C6.2 C8.2 C37.1 C43.1 C44.1 C45.1 C46.2 C47.2 D3.2 F2.2 P3.1 R1.2 R2.1 R64.1 R70.1 R73.1 R76.1 R77.1 R81.1 R82.1 R86.1 R88.1 R91.2 R96.1 TP1.1 U1.2 U2.2 U2.3 U18.3 | length 2310.6
  Top Layer w10: U18.3@1504.36,2470.8 ccw(c1505.36,2470.8) U18.3@1505.36,2469.8
  Top Layer w15: v1(968.86,184.96) R96.1@968.86,224.07 ; v1(1174.72,184.96) R82.1@1174.72,224.07 ; v1(1381.07,184.96) R77.1@1381.07,224.07 ; v1(1465,2565) 1465.36,2565.36 1504,2565.36 C37.1@1504.36,2565.72 U18.3@1504.36,2470.8 ; v1(1586.45,184.96) R88.1@1586.45,224.07 ; v1(1792.31,184.96) R86.1@1792.31,224.07 ; v1(1998.17,184.96) R81.1@1998.17,224.07 ; v1(2204.03,186.38) R76.1@2204.03,225.49 ; v1(2409.89,185.6) R70.1@2409.89,224.7 ; v1(2615.76,186.38) R64.1@2615.76,225.49
  Top Layer w20: R73.1@1300,2623.69 v1(1300,2670) ; v1(1935,2565) 1935.43,2565.43 1935.43,2600.57 cw(c1974.86,2600.57) 1974.86,2640 2447.37,2640 cw(c2447.37,2613.65) 2473.72,2613.65 2473.72,2370.82 cw(c2447.61,2370.82) 2447.61,2344.71 R91.2@2325.35,2344.71 ; R2.1@2615.98,1529.24 2645.88,1529.24 v2(2645.88,1529.17) ; 2640,1147.35 ccw(c2640,1148.25) 2640.9,1148.25
  Bottom Layer w20: v2(2645.88,802.08) v2(2645.88,1529.17)
  other v1: 3064.77,510 3103.88,510 3143,510 3064.77,549 3103.88,549 3143,549
AGND: C22.1 C23.1 C24.1 C25.1 D8.1 D9.1 R10.2 U4.19 | length 252.6
  Top Layer w10: C25.1@746.93,1289.35 v1(746.93,1311.66) C24.1@746.92,1333.97 ; D8.1@747.93,1251.03 C25.1@747.93,1289.35 ; D8.1@748.09,1249.89 D9.1@769.9,1249.89 ; U4.19@896.3,1289.26 v1(948,1289.26)
  Top Layer w15: v1(627.65,1555.27) R10.2@659.7,1555.27 ; v1(629.65,1259.2) C23.1@661.7,1259.2 ; v1(630,1214.36) C22.1@662.05,1214.36
ALRT_RDY: R92.1 U23.2 U27.1 | length 434.9
  Top Layer w10: R92.1@1889.08,2451.36 U23.2@1982.09,2451.36 2037.29,2451.36 cw(c2037.29,2436.84) 2051.81,2436.84 2051.81,2293.75 cw(c2035.06,2293.75) 2035.06,2277 1942.2,2277 cw(c1942.2,2278.04) U27.1@1941.17,2278.04
BATT: C21.2 D7.2 R7.2 U4.6 | length 62.9
  Top Layer w10: D7.2@760.12,1589.19 775.49,1589.19
  Top Layer w11.5: 848.74,1545.16 U4.6@896.3,1545.16
BOOT0: R28.2 SW2.1 U4.94 | length 941.1
  Top Layer w10: v1@444.63,1649.5 v1@445,1649.5 ; v1(990.41,1654.05) 1069.37,1654.05 ccw(c1069.37,1667.99) 1083.31,1667.99 U4.94@1083.31,1712.49 1083.31,1832.39 ccw(c1071.83,1832.39) 1071.83,1843.87 R28.2@1030.11,1843.87
  Top Layer w15: SW2.1@444.63,1579.57 v1@444.63,1649.5
  Bottom Layer w10: v1@445,1649.5 v1@445.22,1649.27 ; v1@445.22,1654.27 v1@990.41,1654.27 ; v1@990.19,1649.27 v1@990.41,1649.05
  other v1: 445,1654.5
CAN1_N: D26.2 P16.1 R52.2 R102.1 | length 1187.4
  Top Layer w7: P16.1@2791.05,2922.17 2714.58,2922.17 ccw(c2714.58,2907.26) 2699.66,2907.26 2699.66,2745.21 ccw(c2712.32,2745.21) 2712.32,2732.55 2757.04,2732.55 cw(c2757.04,2721.83) 2767.76,2721.83 D26.2@2767.76,2698.27 ; R102.1@2834.14,2698.27 D26.2@2767.76,2698.27 ; R52.2@3043.23,2433.32 3047.82,2442.32 cw(c3061.04,2433.32) 3061.04,2449.32 3110.73,2449.32 ccw(c3110.73,2487.32) 3148.73,2487.32 3148.73,2560 ccw(c3110.73,2560) 3110.73,2598 2761.46,2598 cw(c2761.46,2620.09) 2739.36,2620.09 2739.36,2689.09 cw(c2748.55,2689.09) 2748.55,2698.27 D26.2@2767.76,2698.27
CAN1_P: D26.1 P14.1 R50.2 R53.2 | length 1184.5
  Top Layer w7: P14.1@2585.19,2922.17 2666.74,2922.17 cw(c2666.74,2907.26) 2671.61,2921.36 cw(c2666.74,2907.26) 2680.84,2912.12 cw(c2666.74,2907.26) 2681.66,2907.26 2681.66,2872.96 2681.66,2852.46 cw(c2673.16,2852.46) 2673.16,2843.96 2646.58,2843.96 ccw(c2646.58,2835.46) 2646.58,2826.96 2673.16,2826.96 cw(c2673.16,2818.46) 2681.66,2818.46 2681.66,2790 2681.66,2709.57 D26.1@2692.96,2698.27 ; R53.2@2625.22,2697.75 2625.74,2698.27 D26.1@2692.96,2698.27 ; R50.2@3043.23,2483.32 3048.62,2474.32 ccw(c3061.85,2483.32) 3061.85,2467.32 3110.73,2467.32 ccw(c3110.73,2487.32) 3130.73,2487.32 3130.73,2560 ccw(c3110.73,2560) 3110.73,2580 2761.46,2580 cw(c2761.46,2620.09) 2721.36,2620.09 2721.36,2689.09 ccw(c2712.18,2689.09) 2712.18,2698.27 D26.1@2692.96,2698.27
CAN1_RXD: R30.2 R51.1 | length 1677.9
  Top Layer w10: R30.2@1407.83,1880.97 v1@1407.83,2000.89
  Top Layer w15: v1(2560,2383.32) R51.1@2594.22,2383.32
  Bottom Layer w10: v1(1407.93,2000.89) 1407.93,2357.93 cw(c1433.32,2357.93) 1433.32,2383.32 1812.21,2383.32 cw(c1812.21,2373.32) 1814.69,2383.01 ccw(c1821.26,2409) 1827.87,2383.02 cw(c1830.32,2373.32) 1830.32,2383.32 v1(2560,2383.32)
CAN1_SHDN: R33.2 R54.1 | length 2655.6
  Top Layer w10: R33.2@1281.85,1880.87 1281.95,1880.97 v1@1281.95,2000.79 ; v1@1281.95,2000.89 v1@1281.95,2000.79 ; v1(1282.06,2000.89) v1@1281.95,2000.79
  Top Layer w15: v1(2853.3,2323.06) R54.1@2887.52,2323.06
  Bottom Layer w10: v1(1282.06,2000.89) 1282.06,2609.87 cw(c1312.18,2609.87) 1312.18,2640 2822.51,2640 cw(c2822.51,2609.21) 2853.3,2609.21 v1(2853.3,2323.06)
CAN1_STB: R32.2 R48.1 | length 2420.2
  Top Layer w10: R32.2@1323.91,1880.97 v1@1323.91,2000.89
  Top Layer w15: v1(2736.49,2323.07) R48.1@2770.71,2323.07
  Bottom Layer w10: v1(1324.01,2000.89) 1324.01,2575.06 cw(c1349.53,2575.06) 1349.53,2600.57 2706.95,2600.57 cw(c2706.95,2571.03) 2736.49,2571.03 v1(2736.49,2323.07)
CAN1_TXD: R31.2 R49.1 | length 1869.2
  Top Layer w10: R31.2@1365.87,1880.97 v1@1365.87,2000.89
  Top Layer w15: v1(2560,2533.32) R49.1@2594.22,2533.32
  Bottom Layer w10: v1(1365.97,2000.89) 1365.97,2506.85 cw(c1392.44,2506.85) 1392.44,2533.32 v1(2560,2533.32)
CAN2_N: D27.2 P23.1 R59.2 R103.1 | length 909.5
  Top Layer w7: R59.2@3129.22,2010.09 3133.89,2019.09 cw(c3147.12,2010.09) 3147.12,2026.09 3215.95,2026.09 ccw(c3215.95,2063.77) 3253.64,2063.77 3253.64,2123.98 cw(c3273.92,2123.98) 3273.92,2144.26 3310.62,2144.26 cw(c3310.62,2135.07) 3319.8,2135.07 D27.2@3319.8,2115.86 ; R103.1@3319.8,2049.48 D27.2@3319.8,2115.86 ; P23.1@3703.7,2092.57 3703.7,2169.04 ccw(c3688.79,2169.04) 3688.79,2183.96 3366.74,2183.96 ccw(c3366.74,2171.3) 3354.08,2171.3 3354.08,2126.58 cw(c3343.36,2126.58) 3343.36,2115.86 D27.2@3319.8,2115.86
CAN2_P: D27.1 P21.1 R57.2 R60.2 | length 902.6
  Top Layer w7: R57.2@3129.22,2060.09 3134.45,2051.09 ccw(c3147.68,2060.09) 3147.68,2044.09 3215.95,2044.09 ccw(c3215.95,2063.77) 3235.64,2063.77 3235.64,2123.98 cw(c3273.92,2123.98) 3273.92,2162.26 3310.62,2162.26 ccw(c3310.62,2171.44) 3319.8,2171.44 D27.1@3319.8,2190.66 ; R60.2@3319.28,2258.4 3319.8,2257.88 D27.1@3319.8,2190.66 ; P21.1@3703.7,2298.43 3703.7,2216.88 cw(c3688.79,2216.88) 3702.89,2212.01 cw(c3688.79,2216.88) 3693.65,2202.78 cw(c3688.79,2216.88) 3688.79,2201.96 3591.58,2201.96 3566,2201.96 cw(c3566,2210.46) 3557.5,2210.46 3557.5,2220.85 ccw(c3549,2220.85) 3540.5,2220.85 3540.5,2210.46 cw(c3532,2210.46) 3532,2201.96 3528.5,2201.96 3331.1,2201.96 D27.1@3319.8,2190.66
CAN2_RXD: R22.1 R58.1 | length 1625.2
  Top Layer w10: R22.1@1673.66,1159.87 1753.01,1159.87 ccw(c1753.01,1178.06) 1771.2,1178.06 1771.2,1281.89 cw(c1790.32,1281.89) 1790.32,1301 2371.35,1301 ccw(c2371.35,1339.16) 2409.51,1339.16 2409.51,1993.3 cw(c2426.3,1993.3) 2426.3,2010.09 R58.1@2488.22,2010.09
CAN2_TXD: R24.1 R56.1 | length 1680.4
  Top Layer w10: R24.1@1673.66,1202.97 1729.76,1202.97 ccw(c1729.76,1223.39) 1750.19,1223.39 1750.19,1288.61 cw(c1782.58,1288.61) 1782.58,1321 2365.5,1321 ccw(c2365.5,1342.01) 2386.51,1342.01 2386.51,2087.68 cw(c2408.92,2087.68) 2408.92,2110.09 R56.1@2488.22,2110.09
COOLANT_NTC1: P22.1 R84.2 | length 593.5
  Top Layer w15: R84.2@1888.68,2511.81 1888.68,2790.68 cw(c1914,2790.68) 1914,2816 2070,2816 ccw(c2070,2836) 2090,2836 2090,2920.01 ccw(c2087.84,2920.01) P22.1@2087.84,2922.17
COOLANT_NTC2: P24.1 R87.1 U23.4 | length 865.3
  Top Layer w10: P24.1@1881.98,2922.17 1806.32,2922.17 ccw(c1806.32,2902.32) 1786.46,2902.32 1786.46,2384.51 ccw(c1802.97,2384.51) 1802.97,2368 1875.98,2368 ccw(c1875.98,2380.71) 1888.68,2380.71 R87.1@1888.7,2408.99 ; R87.1@1888.68,2412 U23.4@1982.09,2411.99
DI_PC12: R27.2 R101.2 U27.4 | length 1201.8
  Top Layer w10: R27.2@1449.78,1880.97 v1@1449.78,2000.89 ; v1(2135.31,2278.42) v1@2135.51,2278.23
  Top Layer w15: v1@2135.51,2278.23 U27.4@2194.79,2278.23 ; U27.4@2194.99,2278.04 2194.99,2278.42 R101.2@2261.31,2278.42
  Bottom Layer w10: v1(1449.88,2000.89) 1449.88,2261.3 cw(c1466.91,2261.3) 1466.91,2278.33 v1@2135.41,2278.33
DI_PD5: R34.2 R61.1 U9.4 | length 2908.7
  Top Layer w10: R34.2@1239.9,1880.87 1239.95,1880.92 1239.95,1972.95 v1(1240,1973)
  Top Layer w15: R61.1@2538.93,593.9 U9.4@2614.26,593.9 ; U9.4@2615.76,593.9 v1(2615.76,670)
  Bottom Layer w10: v1(1240,1973) 2583.98,1973 cw(c2583.98,1941.22) 2615.76,1941.28 2615.76,1611.6 v1(2615.76,670)
DI_PD6: R35.2 R68.1 U12.4 | length 2687.5
  Top Layer w10: R35.2@1197.97,1880.9 v1(1198,1945)
  Top Layer w15: R68.1@2333.07,593.9 U12.4@2408.39,593.9 ; U12.4@2409.89,593.9 v1(2409.89,670)
  Bottom Layer w10: v1(1198,1945) 2374.97,1944.98 cw(c2374.97,1910.05) 2409.89,1910.05 v1(2409.89,670)
DI_PD7: R36.2 R74.1 U16.4 | length 2466.2
  Top Layer w10: R36.2@1155.98,1880.87 v1(1156.02,1916.98)
  Top Layer w15: R74.1@2127.21,594.4 U16.4@2202.53,594.4 ; U16.4@2204.03,593.9 v1(2204.03,670)
  Bottom Layer w10: v1(1156.02,1916.98) 2166.02,1916.98 cw(c2166.02,1878.97) 2204.03,1878.97 v1(2204.03,670)
DI_PD8: R38.2 R78.1 U19.4 | length 1143
  Top Layer w15: R38.2@1673.66,1248.07 v1(1712,1248.05) ; R78.1@1921.35,595.4 U19.4@1996.67,595.4 ; v1(1998,699) 1998.09,698.91 1998.09,593.98 U19.4@1998.17,593.9
  Bottom Layer w10: v1(1712,1248.05) 1675.15,1248.05 ccw(c1675.15,1233.31) 1660.4,1233.31 1660.4,717.83 ccw(c1679.59,717.83) 1679.59,698.64 1997.64,698.64 v1(1998,699)
DI_PD9: R40.2 R83.1 U21.4 | length 1042.1
  Top Layer w15: R40.2@1673.66,1292.16 v1(1712,1292.16) ; R83.1@1715.49,595.4 U21.4@1790.81,595.4 ; U21.4@1792.31,593.9 v1(1792.31,670)
  Bottom Layer w10: v1(1712,1292.16) 1642.61,1292.16 ccw(c1642.61,1278.7) 1629.14,1278.7 1629.14,693.52 ccw(c1652.66,693.52) 1652.66,670 v1(1792.31,670)
DI_PE7: R37.1 R95.1 U25.4 | length 535.8
  Top Layer w10: v1(970,849) 1088.31,849 ccw(c1088.31,873.73) 1113.05,873.73 R37.1@1113.05,921.5
  Top Layer w15: R95.1@892.04,595.4 U25.4@967.36,595.4 ; U25.4@968.86,593.9 969.43,594.46 969.43,704.43 v1(970,705)
  Bottom Layer w15: v1(970,705) v1(970,849)
DI_PE8: R39.1 R89.1 U24.4 | length 1266.5
  Top Layer w10: U24.4@270.54,593.9 U24.4@272.04,592.4 272.04,780.82 cw(c303.22,780.82) 303.22,812 1131.81,812 ccw(c1131.81,835.7) 1155.51,835.7 R39.1@1155.51,921.5
  Top Layer w15: R89.1@195.21,593.9 U24.4@270.54,593.9
DI_PE9: R41.1 R85.1 U22.4 | length 781.5
  Top Layer w10: v1(1197.97,849) R41.1@1197.97,921.5
  Top Layer w15: R85.1@1509.62,595.4 U22.4@1584.95,595.4 ; U22.4@1586.45,593.9 v1(1586.45,670)
  Bottom Layer w15: v1(1197.97,849) 1563.45,849 cw(c1563.45,826) 1586.45,826 v1(1586.45,670)
DI_PE10: R42.1 R80.1 U20.4 | length 459.2
  Top Layer w10: U20.4@1174.72,593.9 1174.72,679.82 cw(c1199.9,679.82) 1199.9,705 v1(1241,705) ; R42.1@1240.43,921.5 1241,921.5 1240.71,921.21 1240.71,812.29 v1(1241,812)
  Top Layer w15: R80.1@1097.9,595.4 U20.4@1173.22,595.4
  Bottom Layer w15: v1(1241,705) v1(1241,812)
DI_PE11: R43.1 R75.1 U17.4 | length 492.7
  Top Layer w10: v1(1282,705) 1358,705 cw(c1358,682.41) 1380.59,682.41 U17.4@1380.59,593.9 ; v1(1282,812) 1282.44,812.44 1282.44,920.17 1282,920.61 cw(c1282.89,920.61) R43.1@1282.89,921.5
  Top Layer w15: R75.1@1304.25,595.4 U17.4@1379.57,595.4
  Bottom Layer w15: v1(1282,705) v1(1282,812)
DI_PE12: R44.1 R69.1 U13.4 | length 1229.8
  Top Layer w10: U13.4@477.9,592.4 477.9,748.28 cw(c505.36,748.28) 505.36,775.74 1301.36,775.74 ccw(c1301.36,799.73) 1325.35,799.73 R44.1@1325.35,921.5
  Top Layer w15: R69.1@401.08,593.9 U13.4@476.4,593.9
DI_PE13: R45.1 R63.1 U10.4 | length 1067.8
  Top Layer w10: U10.4@683.76,592.4 683.76,715.44 cw(c708.04,715.44) 708.04,739.72 1343.85,739.72 ccw(c1343.85,763.68) 1367.81,763.68 R45.1@1367.81,921.5
  Top Layer w15: R63.1@606.94,593.9 U10.4@682.26,593.9
ENGINE_TEMP: D19.2 P9.1 | length 393.2
  Top Layer w20: P9.1@1303.23,-46.9 D19.2@1303.23,346.28
FUEL: D21.2 P1.1 P15.1 R79.2 U18.1 U23.5 | length 985.1
  Top Layer w10: U18.1@1686.46,2469.8 1686.46,2368 ccw(c1710.79,2368) 1710.79,2343.67 1967.99,2343.67 ccw(c1967.99,2357.77) 1982.09,2357.77 U23.5@1982.09,2392.31
  Top Layer w20: D21.2@1671.91,2645.72 P1.1@1743,2645.72
  Top Layer w25: P15.1@1671.91,2922.17 D21.2@1671.91,2645.72 R79.2@1671.91,2565.72 1671.91,2483.35 ccw(c1685.46,2483.35) U18.1@1685.46,2469.8
GEAR_1: D13.2 P26.1 | length 393.2
  Top Layer w20: P26.1@2744.26,-46.9 D13.2@2744.26,346.28
GEAR_2: D16.2 P27.1 | length 393.2
  Top Layer w20: P27.1@2538.4,-46.9 D16.2@2538.4,346.28
GEAR_3: D18.2 P28.1 | length 393.2
  Top Layer w20: P28.1@2332.54,-46.9 D18.2@2332.54,346.28
GEAR_4: D20.2 P29.1 | length 393.2
  Top Layer w20: P29.1@2126.68,-46.9 D20.2@2126.68,346.28
GEAR_5: D23.2 P30.1 | length 393.2
  Top Layer w20: P30.1@1920.82,-46.9 D23.2@1920.82,346.28
GND: C2.2 C3.2 C4.1 C5.1 C6.1 C8.1 C9.1 C10.1 C33.1 C34.1 C37.2 C38.1 C39.1 C40.1 C42.1 C43.2 C44.2 C45.2 C46.1 C47.1 D3.1 D4.1 D21.1 D27.3 D28.2 J16.1 LED1.2 LED4.2 P5.1 P8.1 P17.1 P20.1 P25.1 P32.1 P33.1 R3.1 R87.2 R93.2 R94.1 U1.1 U2.4 U7.9 U7.10 U7.15 U10.2 U11.2 U13.2 U23.3 U24.2 U26.5 U27.2 | length 2998.9
  Top Layer w6: v1@2806,1284.35 v1(2806,1285) ; C2.2@2899.38,1284.35 2899.38,1291.59 2899.38,1316.59 cw(c2907.14,1316.59) C2.2@2907.14,1324.35 ; v1(3170.57,2160.09) v1@3170.72,2160.09
  Top Layer w10: D21.1@1597,2645.72 D21.1@1597.1,2645.72 ; v1(1821.26,2409) 1821,2409 R87.2@1851.7,2408.99 ; U23.3@1982.09,2431.68 2019.84,2431.68 cw(c2019.84,2422.28) 2029.24,2422.28 2029.24,2368.39 cw(c2011.32,2368.39) 2023.04,2354.84 v1(2011.32,2344.71) ; C5.1@3249,1325.82 ccw(c3250.48,1325.82) 3250.31,1324.35 ccw(c3250.48,1325.82) C5.1@3250.48,1324.34
  Top Layer w15: C37.2@1541.36,2565.72 v1@1569.64,2565.72 ; v1@1882,2228.04 U27.2@1941.17,2228.04 ; v1(2135.51,2344.71) R94.1@2168.51,2344.71 ; U26.5@2175.46,1990.26 2305.07,1990.26 ccw(c2305.07,2010.09) 2318.72,1995.71 v1(2333.91,2010.09) ; C38.1@2300.32,2454.69 2300.32,2458.19 2315.18,2473.05 2315.18,2477.41 v1(2316.83,2479.06) ; v1(2464,1248) 2464.08,1248.08 2464.08,1529.17 LED1.2@2464.15,1529.24 LED4.2@2464.15,1607.27 ; R3.1@3439.77,1025.24 v1(3492.27,1025.24)
  Top Layer w20: v1(322.04,259.57) U24.2@322.04,338.58 ; v1(527.9,259.57) U13.2@527.9,338.58 ; v1(733.76,259.57) U10.2@733.76,338.58 ; C42.1@2303.1,2140.72 v1(2333.91,2140.72) ; v1(2835.42,545.59) 2899.03,545.59 C3.2@2899.38,545.24 ; v1(2843.7,252.1) C46.1@2843.7,302.57 ; C2.2@2907.14,1324.35 C4.1@3087.65,1324.35 3250.31,1324.35 C6.1@3333.7,1324.35 ; v1(2929.7,252.1) D3.1@2929.7,295.55 ; U7.15@3010.15,2160.09 v1(3170.57,2160.09) ; C33.1@3132.38,1960.04 3168.96,1960.04 v1(3169,1960) ; v1@3170.72,2160.09 C34.1@3170.72,2211.09 ; C45.2@3254.38,545.24 v1(3320.52,545.24) ; D27.3@3398.54,2153.26 3398.91,2153.63 3452.63,2153.63 v1(3453,2154) ; v1(3545.42,545.59) C44.2@3609.03,545.59
  Top Layer w30: D21.1@1597,2645.72 v1(1597,2695) ; v1(1860.83,825.3) 1860.83,854.43 1878.7,872.3 D4.1@1878.7,901.42 ; v1(1902.76,825.29) 1921.36,825.29 ; 1921.38,825.3 C9.1@1996.38,825.3 ; C10.1@2096.38,825.29 2225.78,825.29 C8.1@2240.78,865.28 ; U2.4@2353.29,1082.52 v1(2437.45,1082.52) v1(2474.08,1082.52) ; v1(2573.55,1248.08) C43.2@2573.55,1364.42 ; v1@2806,1284.35 C2.2@2899.38,1284.35 ; U7.9@3010.15,1865.29 U7.10@3010.15,1905.09
  other v1: 1860.83,786.29 1902.76,786.29 2766.88,1246 2806,1246 2766.88,1285 3215.95,1960.09 1882,2228 1569.64,2566.07
GND-ISO: C1.1 C11.1 C12.1 C13.2 C14.2 C15.1 C16.1 C17.1 C18.1 C19.1 C20.1 C21.1 C26.1 C27.1 C28.1 C29.1 C30.1 C31.1 C32.1 C35.2 C36.2 C41.2 D2.1 D5.1 D6.1 D7.1 D10.1 D11.2 D12.2 D26.3 J1.3 J2.5 J3.5 J3.SH1 J3.SH2 J3.SH3 LED2.2 LED3.2 LED5.2 P18.1 R10.1 R28.1 R55.1 SW1.2 U1.7 U3.6 U3.7 U4.10 U4.26 U4.49 U4.74 U4.99 U5.2 U6.2 U7.2 U7.8 U8.3 U9.3 U10.3 U11.3 U12.3 U13.3 U14.3 U15.3 U16.3 U17.3 U19.3 U20.3 U21.3 U22.3 U24.3 U25.3 U26.4 U27.3 X1.2 X1.4 | length 3990.9
  Top Layer w6: 761.24,1782.15 D6.1@795.74,1782.15 C15.1@827.52,1782.15
  Top Layer w7: C21.1@741.99,1559.34 D7.1@741.99,1589.19
  Top Layer w10: J3.5@46.58,1191.81 50.44,1187.95 J3.5@56.42,1187.95 ; D12.2@149.73,1161.59 D12.2@149.15,1162.17 170.84,1162.17 v1(170.84,1162.36) ; D10.1@513.71,1295.56 v1(535.51,1295.56) 535.51,1333.39 ccw(c534.33,1333.39) C26.1@534.33,1334.57 ; X1.2@654.58,1397.47 659.7,1397.47 C28.1@659.7,1350.99 ; C27.1@696.7,1508.99 696.7,1456.52 X1.4@701.81,1456.52 744.95,1456.52 cw(c744.95,1454.55) C16.1@746.92,1454.55 ; v1@721.79,1555.27 v1(721.79,1555.37) ; v1(727,966) v1@727.33,966 ; C21.1@737.92,1555.27 ccw(c737.92,1559.34) C21.1@741.99,1559.34 ; v1@746.92,1480.2 v1(747.31,1480.2) ; v1(827.3,1811.99) 827.52,1811.77 827.52,1782.15 827.52,1780.45 C15.1@827.74,1780.23 C20.1@871.5,1780.23 ; v1(838.06,1480.2) 846.46,1470.8 ccw(c857,1480.2) 857,1466.08 U4.10@895.95,1466.08 ; U4.26@965.2,1102.25 v1(965.2,1177.05) ; v1(984.55,1758.88) 984.72,1758.71 984.72,1712.66 U4.99@984.88,1712.49 ; R28.1@1029.89,1881.09 1030.14,1881.33 v1@1030.14,1916.95 ; C36.2@1310,2146.98 v1@1481.98,2146.98 ; C13.2@1398.27,1001.72 C18.1@1443.55,1001.72 ; U4.49@1417.96,1102.25 v1(1417.96,1153.95) ; v1(1454.84,1623.91) U4.74@1506.54,1623.91 ; v1@1483,2148 cw(c1481.98,2148) v1@1481.98,2146.98 ; v1@1493,2146.98 v1@1481.98,2146.98 ; C19.1@1530.16,1781.23 ccw(c1531.16,1781.23) C19.1@1531.16,1780.23 ; D11.2@1699.25,1817.63 v1(1699.25,1863.87) ; v1(1806,2140) cw(c1806.72,2140) v1@1806.72,2140.72 ; J2.5@1948.67,1744.31 1954.68,1744.31 ccw(c1954.68,1753.79) 1964.16,1753.79 v1(1963.95,1753) ; v1(2135.31,2228.04) v1@2135.51,2227.84 ; v1(2454.03,2210.44) v1@2454.35,2210.76 ; v1(2686,2160) v1@2686,2160.09 ; v1(2895.66,1411) v1@2896.23,1411 ; D2.1@3113.11,1432.03 D2.1@3134.14,1411
  Top Layer w12: v1(303.59,1123.89) 303.65,1123.94 348.52,1123.94 U5.2@348.57,1124
  Top Layer w15: v1(231.1,1851) C35.2@231.1,1884.92 ; v1(310.77,1259.2) SW1.2@310.77,1334.57 ; v1(322.04,528.5) U24.3@322.04,592.4 ; v1(527.9,528.5) U13.3@527.9,592.4 ; R10.1@696.7,1555.27 v1@721.79,1555.27 ; v1@721.83,1555.27 C21.1@737.92,1555.27 ; v1@727.33,966 LED5.2@727.33,1008.57 ; v1(733.76,528.5) U10.3@733.76,592.4 ; C16.1@746.92,1454.55 v1@746.92,1480.2 ; v1@984.88,967.5 C17.1@984.88,1001.87 ; v1(1018.86,530) U25.3@1018.86,593.9 ; v1(1224.72,530) U20.3@1224.72,593.9 ; v1(1430.59,530) U17.3@1430.59,593.9 ; C19.1@1530.16,1781.23 v1(1530.16,1863.87) ; C14.2@1573.46,1780.23 v1(1573.46,1863.87) ; v1(1636.45,530) U22.3@1636.45,593.9 ; v1@1806.72,2140.72 C41.2@1843,2140.72 ; v1(1842.31,530) U21.3@1842.31,593.9 ; U26.4@1962.4,1990.72 2012.92,1990.72 ccw(c2012.92,2015.8) 2038,2015.8 v1(2038,2040.72) ; v1(2048.17,530) U19.3@2048.17,593.9 ; v1@2135.51,2227.84 U27.3@2194.79,2227.84 ; U27.3@2194.99,2227.65 U27.3@2194.99,2228.04 ; v1(2254.03,530) U16.3@2254.03,593.9 ; v1(2459.89,530) U12.3@2459.89,593.9 ; LED2.2@2464.15,1685.29 LED3.2@2464.15,1763.32 v1(2464.15,1815) ; v1(2560,2433.32) C30.1@2594.22,2433.32 ; v1(2560,2483.32) C29.1@2594.22,2483.32 ; v1(2665.76,530) U9.3@2665.76,593.9 ; D26.3@2737.42,2767.21 v1(2771.64,2767.21) ; R55.1@3043.22,2383.06 v1(3077.45,2383.06)
  Top Layer w20: J3.5@46.58,1191.81 J3.SH2@46.58,1221.42 ; v1(105,2077.54) U8.3@156.3,2077.54 ; v1(319.64,1953.52) U11.3@319.64,2017.58 ; v1(473,1397.47) X1.2@654.58,1397.47 ; U15.3@1165.24,2350.83 U15.3@1165.24,2351.37 v1(1165.24,2418.32) ; v1(1177.39,2214.27) 1177.61,2214.49 1177.61,2260.31 U14.3@1177.84,2260.54 ; v1(1443.55,958.5) C18.1@1443.55,998.64 ; v1(2415,2268.04) C31.1@2458.72,2268.04 ; v1@2454.35,2210.76 C32.1@2485.59,2210.76 ; U7.8@2626.29,1860.09 v1@2686,1860.09 ; U7.2@2626.29,2160.09 v1@2686,2160.09 ; U6.2@2711.92,2483.32 v1(2767.76,2483.32) ; D5.1@2732.71,1538.05 v1(2732.71,1613.35) ; v1(3332.71,1478) C1.1@3332.71,1546.19
  Top Layer w30: v1@2896.23,1411 C12.1@2896.23,1452.65 ; C11.1@2984.33,1437.65 D2.1@3121.96,1437.65 ; D2.1@3113.11,1432.03 v1(3256,1432.03)
  other v1: 984.88,966 2833.67,1662 2880.79,1662 2833.67,1691 2880.79,1691 2686,1860 1030.16,1916.98 1493,2148
GR_NEUTRAL: D24.2 P11.1 | length 393.2
  Top Layer w20: P11.1@1714.95,-46.9 D24.2@1714.95,346.28
H_BEAM: P12.1 R90.1 | length 267.5
  Top Layer w20: P12.1@272.04,-47.43 R90.1@272.04,220.03
I2C1_SCL: R17.1 R99.1 U26.3 | length 1229.3
  Top Layer w10: R99.1@988.15,1843.87 980.65,1847.25 953.46,1876.87 R17.1@946.2,1880.87 946.2,2021.61 cw(c965.3,2021.61) 965.3,2040.72 U26.3@1967.14,2040.72
I2C1_SDA: R18.1 R97.1 U26.2 | length 1325.3
  Top Layer w10: R97.1@861.75,1843.63 869.25,1847.63 871.12,1849.51 896.74,1877.03 R18.1@904.24,1880.87 904.24,2064.15 cw(c930.8,2064.15) 930.8,2090.72 U26.2@1973.91,2090.72
I2C_SCL: R100.1 U23.10 U26.6 | length 682.4
  Top Layer w10: U23.10@2155.32,2471.05 2090.76,2471.05 ccw(c2090.76,2454.73) 2074.45,2454.73 2074.45,2060.86 ccw(c2094.59,2060.86) 2094.59,2040.72 U26.6@2175,2040.72 R100.1@2261.31,2040.72
I2C_SDA: R98.1 U23.9 U26.7 | length 565.8